# Altium PCB K601-6252双模带屏 VER 1.1 2026 10 16.PcbDoc (part 8 of 12)
Units mm, origin at the board's own origin, x right, y up, seen from the top; angles counter-clockwise.
Board outline 75.02 x 25.73 mm, 2 copper layers (Top Layer, Bottom Layer); 43 components, 67 nets, 219 pads, 157 vias.
Unrouted connection lines stored in the file: 1.
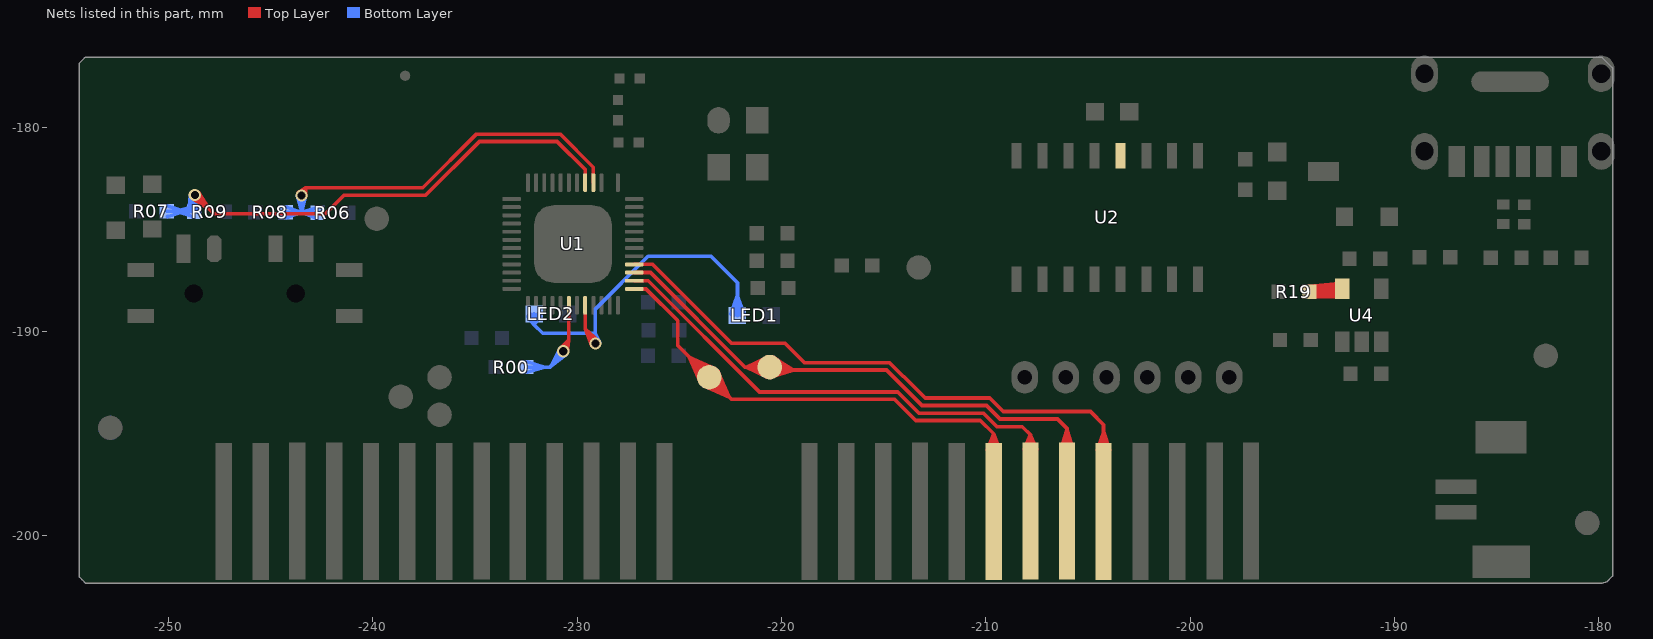
[diagram p8: the nets of this part, all layers, seen from the top]

## Via types
v1: diameter 0.6, hole 0.4, Top Layer to Bottom Layer, tented both sides, 154 vias
v2: diameter 0.6, hole 0.4, Top Layer to Bottom Layer, 3 vias

## Nets (pads, with @x,y where several pads share a name; then routed paths per layer and width w, separated by ;. In a path a pad name is that pad's centre, name@x,y a point inside that pad or via, vN(x,y) a via of type N, cw(c..) or ccw(c..) an arc to the next point about the centre after c; other vN are vias at no path point) (continued)
MODE-BT: R06.2 R08.1 U1.4 | length 53.3
  Top Layer w0.18: U1.4@-229.2,-182.723 -229.2,-181.973 ; v1@-243.63,-183.206 -243.275,-182.973 ; v1@-243.63,-183.206 -243.275,-182.973 ; v1@-243.63,-183.206 -243.275,-182.973 ; v1@-243.63,-183.206 -243.275,-182.973 ; v1@-243.63,-183.206 -243.275,-182.973 ; v1(-243.475,-183.348) -243.475,-183.173 -243.275,-182.973 ; v1(-243.475,-183.348) -243.275,-182.973 ; v1(-243.475,-183.348) -243.275,-182.973 ; v1(-243.475,-183.348) -243.275,-182.973 ; v1(-243.475,-183.348) -243.275,-182.973 ; -243.275,-182.973 -237.546,-182.973 -234.921,-180.348 -230.825,-180.348 -229.2,-181.973 ; -243.275,-182.973 v1@-243.271,-183.398 ; -243.275,-182.973 v1@-243.271,-183.398 ; -243.275,-182.973 v1@-243.271,-183.398 ; -243.275,-182.973 v1@-243.271,-183.398 ; -243.275,-182.973 v1@-243.271,-183.398 ; U1.4@-229.2,-182.368 -229.2,-181.973 ; U1.4@-229.2,-182.368 -229.2,-181.973 ; U1.4@-229.2,-182.368 -229.2,-181.973
  Bottom Layer w0.18: R08.1@-244.25,-184.173 -243.5,-184.173 ; R08.1@-244.25,-184.173 -243.5,-184.173 ; R08.1@-244.25,-184.173 -243.5,-184.173 ; R08.1@-244.205,-184.429 -243.5,-184.173 ; R08.1@-244.205,-184.429 -243.5,-184.173 ; R08.1@-244.205,-184.429 -243.5,-184.173 ; R08.1@-244.205,-184.429 -243.5,-184.173 ; R08.1@-244.205,-183.917 -243.5,-184.173 ; R08.1@-244.205,-183.917 -243.5,-184.173 ; R08.1@-244.205,-183.917 -243.5,-184.173 ; R08.1@-244.205,-183.917 -243.5,-184.173 ; v1@-243.683,-183.375 -243.475,-184.148 ; v1@-243.683,-183.375 -243.475,-184.148 ; v1@-243.683,-183.375 -243.475,-184.148 ; v1@-243.683,-183.375 -243.475,-184.148 ; -243.5,-184.173 -243.475,-184.148 ; -243.5,-184.173 -242.725,-184.173 R06.2@-242.7,-184.198 ; -243.5,-184.173 R06.2@-242.75,-184.453 ; -243.5,-184.173 R06.2@-242.734,-183.94 ; -243.5,-184.173 R06.2@-242.7,-184.198 ; -243.5,-184.173 R06.2@-242.75,-184.453 ; -243.5,-184.173 R06.2@-242.734,-183.94 ; -243.5,-184.173 R06.2@-242.7,-184.198 ; -243.5,-184.173 R06.2@-242.75,-184.453 ; -243.5,-184.173 R06.2@-242.734,-183.94 ; -243.5,-184.173 R06.2@-242.7,-184.198 ; -243.5,-184.173 R06.2@-242.75,-184.453 ; -243.5,-184.173 R06.2@-242.734,-183.94 ; -243.5,-184.173 R06.2@-242.7,-184.198 ; -243.5,-184.173 R06.2@-242.75,-184.453 ; -243.5,-184.173 R06.2@-242.734,-183.94 ; -243.475,-184.148 v1(-243.475,-183.348) ; -243.475,-184.148 v1@-243.267,-183.375 ; -243.475,-184.148 v1@-243.267,-183.375 ; -243.475,-184.148 v1@-243.267,-183.375 ; -243.475,-184.148 v1(-243.475,-183.348) ; -243.475,-184.148 v1@-243.267,-183.375 ; -243.475,-184.148 v1(-243.475,-183.348)
MODE_2.4G: R07.1 R09.2 U1.5 | length 190.4
  Top Layer w0.18: U1.5@-229.6,-182.723 -229.6,-182.082 ; v1@-248.832,-183.486 -248.018,-184.004 ; v1@-248.832,-183.486 -248.018,-184.004 ; v1@-248.832,-183.486 -248.018,-184.004 ; v1@-248.832,-183.486 -248.018,-184.004 ; v1(-248.7,-183.323) -247.775,-184.248 -242.303,-184.248 -241.388,-183.333 -237.397,-183.333 -234.772,-180.708 -230.974,-180.708 -229.6,-182.082 ; v1(-248.7,-183.323) -248.018,-184.004 ; v1(-248.7,-183.323) -248.018,-184.004 ; v1@-248.536,-183.191 -248.018,-184.004 ; v1@-248.536,-183.191 -248.018,-184.004 ; v1@-248.536,-183.191 -248.018,-184.004 ; v1@-248.536,-183.191 -248.018,-184.004 ; U1.5@-229.6,-182.368 -229.6,-182.082 ; U1.5@-229.6,-182.368 -229.6,-182.082 ; U1.5@-229.6,-182.368 -229.6,-182.082
  Bottom Layer w0.18: v1@-248.905,-183.278 R09.2@-248.963,-184.038 ; v1@-248.891,-183.41 R09.2@-248.481,-184.053 ; v1@-248.492,-183.291 R09.2@-248.484,-184.045 ; v1@-248.493,-183.291 R09.2@-248.481,-184.053 ; R07.1@-250.075,-184.123 -248.745,-184.123 R09.2@-248.725,-184.143 ; R07.1@-250.075,-184.123 -249.185,-184.123 ; R07.1@-250.075,-184.123 -249.185,-184.123 ; R07.1@-250.037,-184.38 -249.185,-184.123 ; R07.1@-250.037,-184.38 -249.185,-184.123 ; R07.1@-250.037,-184.38 -249.185,-184.123 ; R07.1@-250.037,-184.38 -249.185,-184.123 ; R07.1@-250.037,-183.865 -249.185,-184.123 ; R07.1@-250.037,-183.865 -249.185,-184.123 ; R07.1@-250.037,-183.865 -249.185,-184.123 ; R07.1@-250.037,-183.865 -249.185,-184.123 ; -249.615,-184.123 R09.2@-248.769,-184.399 ; -249.615,-184.123 R09.2@-248.757,-183.885 ; -249.615,-184.123 R09.2@-248.725,-184.143 ; -249.615,-184.123 R09.2@-248.769,-184.399 ; -249.615,-184.123 R09.2@-248.757,-183.885 ; -249.615,-184.123 R09.2@-248.725,-184.143 ; -249.615,-184.123 R09.2@-248.769,-184.399 ; -249.615,-184.123 R09.2@-248.757,-183.885 ; -249.615,-184.123 R09.2@-248.725,-184.143 ; -249.615,-184.123 R09.2@-248.769,-184.399 ; -249.615,-184.123 R09.2@-248.757,-183.885 ; -249.615,-184.123 R09.2@-248.725,-184.143 ; R09.2@-248.984,-184.16 v1@-248.909,-183.343 ; R09.2@-248.984,-184.16 v1@-248.511,-183.413 ; R09.2@-248.984,-184.16 v1@-248.906,-183.279 ; R09.2@-248.984,-184.16 v1(-248.7,-183.323) ; R09.2@-248.985,-184.158 v1@-248.905,-183.277 ; R09.2@-248.985,-184.158 v1@-248.511,-183.414 ; R09.2@-248.985,-184.158 v1@-248.905,-183.279 ; R09.2@-248.985,-184.158 v1(-248.7,-183.323) ; R09.2@-248.985,-184.156 v1@-248.892,-183.408 ; R09.2@-248.985,-184.156 v1@-248.511,-183.414 ; R09.2@-248.985,-184.156 v1@-248.905,-183.279 ; R09.2@-248.985,-184.156 v1(-248.7,-183.323) ; R09.2@-248.982,-184.1 v1@-248.725,-183.348 ; R09.2@-248.982,-184.1 v1@-248.513,-183.419 ; R09.2@-248.982,-184.1 v1@-248.905,-183.277 ; R09.2@-248.982,-184.1 v1(-248.7,-183.323) ; R09.2@-248.982,-184.1 v1@-248.725,-183.348 ; R09.2@-248.982,-184.1 v1@-248.725,-183.348 ; R09.2@-248.982,-184.1 v1@-248.725,-183.348 ; R09.2@-248.982,-184.1 v1@-248.513,-183.419 ; R09.2@-248.982,-184.1 v1@-248.905,-183.277 ; R09.2@-248.982,-184.1 v1(-248.7,-183.323) ; R09.2@-248.982,-184.1 v1@-248.513,-183.419 ; R09.2@-248.982,-184.1 v1@-248.905,-183.277 ; R09.2@-248.982,-184.1 v1(-248.7,-183.323) ; R09.2@-248.982,-184.1 v1@-248.513,-183.419 ; R09.2@-248.982,-184.1 v1@-248.905,-183.277 ; R09.2@-248.982,-184.1 v1(-248.7,-183.323) ; R09.2@-248.982,-184.1 v1@-248.513,-183.419 ; R09.2@-248.982,-184.1 v1@-248.905,-183.277 ; R09.2@-248.982,-184.1 v1@-248.513,-183.419 ; R09.2@-248.982,-184.1 v1@-248.905,-183.277 ; R09.2@-248.982,-184.1 v1(-248.7,-183.323) ; R09.2@-248.982,-184.1 v1@-248.513,-183.419 ; R09.2@-248.982,-184.1 v1@-248.905,-183.277 ; R09.2@-248.982,-184.1 v1(-248.7,-183.323) ; R09.2@-248.982,-184.1 v1@-248.513,-183.419 ; R09.2@-248.982,-184.1 v1@-248.905,-183.277 ; R09.2@-248.982,-184.1 v1(-248.7,-183.323) ; R09.2@-248.98,-184.094 v1(-248.7,-183.323) ; R09.2@-248.98,-184.094 v1(-248.7,-183.323) ; R09.2@-248.98,-184.094 v1(-248.7,-183.323) ; R09.2@-248.98,-184.094 v1@-248.514,-183.419 ; R09.2@-248.98,-184.094 v1@-248.905,-183.277 ; R09.2@-248.98,-184.094 v1@-248.514,-183.419 ; R09.2@-248.98,-184.094 v1@-248.905,-183.277 ; R09.2@-248.98,-184.094 v1@-248.514,-183.419 ; R09.2@-248.98,-184.094 v1@-248.905,-183.277 ; R09.2@-248.963,-184.038 v1@-248.493,-183.289 ; R09.2@-248.963,-184.038 v1@-248.515,-183.422 ; R09.2@-248.963,-184.038 v1(-248.7,-183.323) ; R09.2@-248.96,-184.03 v1@-248.493,-183.356 ; R09.2@-248.96,-184.03 v1@-248.515,-183.422 ; R09.2@-248.96,-184.03 v1@-248.905,-183.278 ; R09.2@-248.96,-184.03 v1(-248.7,-183.323) ; R09.2@-248.958,-184.028 v1@-248.513,-183.419 ; R09.2@-248.958,-184.028 v1@-248.515,-183.422 ; R09.2@-248.958,-184.028 v1@-248.905,-183.279 ; R09.2@-248.958,-184.028 v1(-248.7,-183.323) ; v1@-248.909,-183.343 R09.2@-248.725,-184.143 ; v1@-248.909,-183.343 R09.2@-248.484,-184.045 ; v1@-248.909,-183.343 R09.2@-248.725,-184.143 ; v1@-248.909,-183.343 R09.2@-248.725,-184.143 ; v1@-248.909,-183.343 R09.2@-248.725,-184.143 ; v1@-248.909,-183.343 R09.2@-248.725,-184.143 ; v1@-248.909,-183.343 R09.2@-248.725,-184.143 ; v1@-248.909,-183.343 R09.2@-248.725,-184.143 ; v1@-248.909,-183.343 R09.2@-248.725,-184.143 ; v1@-248.909,-183.343 R09.2@-248.725,-184.143 ; v1@-248.909,-183.343 R09.2@-248.725,-184.143 ; v1@-248.909,-183.343 R09.2@-248.725,-184.143 ; v1@-248.909,-183.343 R09.2@-248.725,-184.143 ; v1@-248.909,-183.343 R09.2@-248.725,-184.143 ; v1@-248.905,-183.277 R09.2@-248.481,-184.053 ; v1@-248.905,-183.277 R09.2@-248.725,-184.143 ; v1@-248.894,-183.402 R09.2@-248.467,-184.172 ; v1@-248.895,-183.402 R09.2@-248.467,-184.176 ; v1@-248.895,-183.402 R09.2@-248.467,-184.173 ; v1@-248.892,-183.408 R09.2@-248.469,-184.1 ; v1@-248.892,-183.408 R09.2@-248.485,-184.042 ; v1@-248.892,-183.408 R09.2@-248.725,-184.143 ; v1@-248.892,-183.408 R09.2@-248.469,-184.1 ; v1@-248.892,-183.408 R09.2@-248.469,-184.1 ; v1@-248.892,-183.408 R09.2@-248.469,-184.1 ; v1@-248.892,-183.408 R09.2@-248.469,-184.1 ; v1@-248.892,-183.408 R09.2@-248.469,-184.1 ; v1@-248.892,-183.408 R09.2@-248.469,-184.1 ; v1@-248.892,-183.408 R09.2@-248.469,-184.1 ; v1@-248.892,-183.407 R09.2@-248.467,-184.109 ; v1@-248.892,-183.407 R09.2@-248.467,-184.109 ; v1@-248.892,-183.407 R09.2@-248.467,-184.109 ; R09.2@-248.769,-184.399 -249.615,-184.123 R09.2@-248.757,-183.885 ; R09.2@-248.725,-184.143 v1@-248.725,-183.348 ; R09.2@-248.725,-184.143 v1@-248.493,-183.356 ; R09.2@-248.725,-184.143 v1(-248.7,-183.323) ; R09.2@-248.725,-184.143 v1@-248.725,-183.348 ; R09.2@-248.725,-184.143 v1@-248.493,-183.289 ; R09.2@-248.725,-184.143 v1(-248.7,-183.323) ; R09.2@-248.725,-184.143 v1@-248.513,-183.419 ; R09.2@-248.725,-184.143 v1@-248.725,-183.348 ; R09.2@-248.725,-184.143 v1(-248.7,-183.323) ; R09.2@-248.725,-184.143 v1@-248.493,-183.356 ; R09.2@-248.725,-184.143 v1(-248.7,-183.323) ; R09.2@-248.725,-184.143 v1@-248.493,-183.356 ; R09.2@-248.725,-184.143 v1(-248.7,-183.323) ; R09.2@-248.725,-184.143 v1@-248.493,-183.356 ; R09.2@-248.725,-184.143 v1(-248.7,-183.323) ; R09.2@-248.725,-184.143 v1@-248.493,-183.356 ; R09.2@-248.725,-184.143 v1@-248.493,-183.356 ; R09.2@-248.725,-184.143 v1(-248.7,-183.323) ; R09.2@-248.725,-184.143 v1@-248.493,-183.356 ; R09.2@-248.725,-184.143 v1(-248.7,-183.323) ; R09.2@-248.725,-184.143 v1@-248.493,-183.356 ; R09.2@-248.725,-184.143 v1@-248.493,-183.356 ; R09.2@-248.725,-184.143 v1(-248.7,-183.323) ; R09.2@-248.725,-184.143 v1@-248.493,-183.356 ; R09.2@-248.725,-184.143 v1@-248.493,-183.356 ; R09.2@-248.725,-184.143 v1(-248.7,-183.323) ; R09.2@-248.725,-184.143 v1@-248.493,-183.356 ; R09.2@-248.725,-184.143 v1(-248.7,-183.323) ; R09.2@-248.725,-184.143 v1@-248.493,-183.356 ; R09.2@-248.725,-184.143 v1(-248.7,-183.323) ; v1@-248.725,-183.348 v1(-248.7,-183.323) ; v1@-248.725,-183.348 R09.2@-248.469,-184.1 ; v1@-248.725,-183.348 R09.2@-248.469,-184.1 ; v1@-248.725,-183.348 R09.2@-248.469,-184.1 ; v1@-248.725,-183.348 R09.2@-248.469,-184.1 ; v1(-248.7,-183.323) R09.2@-248.469,-184.1 ; v1(-248.7,-183.323) R09.2@-248.467,-184.109 ; v1(-248.7,-183.323) R09.2@-248.467,-184.109 ; v1(-248.7,-183.323) R09.2@-248.467,-184.109 ; v1(-248.7,-183.323) R09.2@-248.467,-184.172 ; v1(-248.7,-183.323) R09.2@-248.469,-184.1 ; v1(-248.7,-183.323) R09.2@-248.469,-184.1 ; v1(-248.7,-183.323) R09.2@-248.469,-184.1 ; v1(-248.7,-183.323) R09.2@-248.469,-184.1 ; v1(-248.7,-183.323) R09.2@-248.467,-184.176 ; v1(-248.7,-183.323) R09.2@-248.467,-184.173 ; v1(-248.7,-183.323) R09.2@-248.469,-184.1 ; v1(-248.7,-183.323) R09.2@-248.469,-184.1 ; v1(-248.7,-183.323) R09.2@-248.484,-184.045 ; v1(-248.7,-183.323) R09.2@-248.485,-184.042 ; v1(-248.7,-183.323) R09.2@-248.481,-184.053 ; v1@-248.513,-183.419 R09.2@-248.467,-184.172 ; v1@-248.493,-183.356 R09.2@-248.467,-184.176 ; v1@-248.493,-183.289 R09.2@-248.469,-184.1 ; v1@-248.493,-183.289 R09.2@-248.467,-184.173 ; v1@-248.493,-183.289 R09.2@-248.469,-184.1 ; v1@-248.493,-183.289 R09.2@-248.469,-184.1 ; v1@-248.493,-183.289 R09.2@-248.469,-184.1 ; v1@-248.493,-183.289 R09.2@-248.469,-184.1 ; v1@-248.493,-183.289 R09.2@-248.469,-184.1 ; v1@-248.493,-183.289 R09.2@-248.467,-184.109 ; v1@-248.493,-183.289 R09.2@-248.467,-184.109 ; v1@-248.493,-183.289 R09.2@-248.469,-184.1 ; v1@-248.493,-183.289 R09.2@-248.467,-184.109 ; v1@-248.493,-183.289 R09.2@-248.469,-184.1 ; v1@-248.492,-183.291 R09.2@-248.467,-184.172 ; v1@-248.492,-183.292 R09.2@-248.467,-184.176 ; v1@-248.492,-183.292 R09.2@-248.467,-184.173 ; v1@-248.492,-183.291 R09.2@-248.485,-184.042 ; R09.2@-248.485,-184.042 -248.891,-183.41 R09.2@-248.484,-184.045
MODE_BLE: 
P00: 
P32: R00.1 U1.30 | length 38
  Top Layer w0.18: U1.30@-230.4,-188.723 -230.4,-190.423 ; v1@-230.844,-190.848 -230.4,-190.423 ; v1@-230.844,-190.848 -230.4,-190.423 ; v1@-230.844,-190.848 -230.4,-190.423 ; v1@-230.844,-190.848 -230.4,-190.423 ; v1@-230.844,-190.848 -230.4,-190.423 ; v1(-230.675,-190.973) -230.675,-190.698 -230.4,-190.423 ; v1(-230.675,-190.973) -230.4,-190.423 ; v1(-230.675,-190.973) -230.4,-190.423 ; v1(-230.675,-190.973) -230.4,-190.423 ; v1(-230.675,-190.973) -230.4,-190.423 ; v1@-230.474,-191.033 -230.4,-190.423 ; v1@-230.474,-191.033 -230.4,-190.423 ; v1@-230.474,-191.033 -230.4,-190.423 ; v1@-230.474,-191.033 -230.4,-190.423 ; v1@-230.474,-191.033 -230.4,-190.423 ; -230.4,-189.713 U1.30@-230.4,-189.078 ; -230.4,-189.713 U1.30@-230.4,-189.078 ; -230.4,-189.713 U1.30@-230.4,-189.078
  Bottom Layer w0.18: v1@-230.851,-190.858 -231.267,-191.689 ; R00.1@-232.475,-191.748 -231.325,-191.748 -230.675,-191.098 v1(-230.675,-190.973) ; R00.1@-232.475,-191.748 -231.585,-191.748 ; R00.1@-232.475,-191.748 -231.585,-191.748 ; R00.1@-232.437,-192.005 -231.585,-191.748 ; R00.1@-232.437,-192.005 -231.585,-191.748 ; R00.1@-232.437,-192.005 -231.585,-191.748 ; R00.1@-232.437,-192.005 -231.585,-191.748 ; R00.1@-232.437,-191.49 -231.585,-191.748 ; R00.1@-232.437,-191.49 -231.585,-191.748 ; R00.1@-232.437,-191.49 -231.585,-191.748 ; R00.1@-232.437,-191.49 -231.585,-191.748 ; -231.274,-191.696 v1@-230.529,-191.124 ; -231.274,-191.696 v1@-230.851,-190.858 ; -231.274,-191.696 v1(-230.675,-190.973) ; -231.274,-191.696 v1@-230.529,-191.124 ; -231.274,-191.696 v1@-230.851,-190.858 ; -231.274,-191.696 v1(-230.675,-190.973) ; -231.274,-191.696 v1@-230.529,-191.124 ; -231.274,-191.696 v1@-230.851,-190.858 ; -231.274,-191.696 v1(-230.675,-190.973) ; -231.274,-191.696 v1@-230.529,-191.124 ; -231.274,-191.696 v1@-230.851,-190.858 ; -231.274,-191.696 v1(-230.675,-190.973) ; -231.267,-191.689 v1@-230.529,-191.124 ; -231.267,-191.689 v1(-230.675,-190.973)
PROG: R19.2 U4.5 | length 330.9
  Top Layer w0.305: R19.2@-194.208,-187.868 U4.5@-192.839,-187.74 ; R19.2@-194.187,-188.26 U4.5@-192.887,-188.237 ; R19.2@-194.186,-188.26 -192.915,-188.231 ; R19.2@-194.185,-187.865 U4.5@-192.796,-187.897 ; R19.2@-194.184,-187.865 U4.5@-192.734,-187.901 ; R19.2@-194.181,-187.865 U4.5@-192.85,-187.926 ; R19.2@-194.166,-188.26 U4.5@-192.695,-188.096 ; R19.2@-194.161,-188.26 U4.5@-192.776,-188.065 ; R19.2@-194.138,-188.257 U4.5@-192.796,-187.897 ; R19.2@-194.115,-188.251 U4.5@-192.839,-187.74 ; U4.5@-192.59,-187.864 -193.799,-188.211 ; U4.5@-192.588,-187.864 -193.796,-188.202 ; U4.5@-192.584,-187.713 -193.81,-188.03 ; U4.5@-192.584,-187.863 -193.798,-188.172 ; U4.5@-192.582,-187.863 R19.2@-193.924,-188.18 ; U4.5@-192.581,-187.712 R19.2@-194.175,-188.063 ; U4.5@-192.579,-187.712 R19.2@-193.927,-188.011 ; U4.5@-192.573,-188.104 R19.2@-193.905,-187.851 ; U4.5@-192.558,-187.71 R19.2@-194.101,-187.87 ; U4.5@-192.556,-187.71 R19.2@-193.905,-187.851 ; U4.5@-192.549,-188.105 R19.2@-193.927,-188.011 ; U4.5@-192.546,-188.105 -193.81,-188.03 ; U4.5@-192.543,-188.255 -193.796,-188.202 ; U4.5@-192.543,-188.105 R19.2@-194.175,-188.063 ; U4.5@-192.541,-188.255 -193.799,-188.211 ; R19.2@-194.208,-187.868 U4.5@-192.895,-187.743 ; R19.2@-194.208,-187.868 U4.5@-192.895,-187.743 ; R19.2@-194.208,-187.868 U4.5@-192.894,-187.745 ; R19.2@-194.201,-188.259 -193.799,-188.211 ; R19.2@-194.201,-188.259 -193.799,-188.211 ; R19.2@-194.201,-188.259 -193.799,-188.211 ; R19.2@-194.2,-187.867 U4.5@-192.89,-187.797 ; R19.2@-194.2,-187.867 -192.924,-187.801 ; R19.2@-194.2,-187.867 U4.5@-192.89,-187.797 ; R19.2@-194.2,-187.867 U4.5@-192.893,-187.797 ; R19.2@-194.2,-187.867 U4.5@-192.892,-187.798 ; R19.2@-194.2,-187.867 U4.5@-192.89,-187.797 ; R19.2@-194.2,-187.867 U4.5@-192.888,-187.797 ; R19.2@-194.2,-187.867 U4.5@-192.889,-187.797 ; R19.2@-194.196,-188.259 -193.796,-188.202 ; R19.2@-194.196,-188.259 -193.796,-188.202 ; R19.2@-194.196,-188.259 -193.796,-188.202 ; R19.2@-194.185,-187.865 U4.5@-192.674,-187.888 ; R19.2@-194.185,-187.865 U4.5@-192.659,-187.884 ; R19.2@-194.185,-187.865 U4.5@-192.873,-187.899 ; R19.2@-194.185,-187.865 U4.5@-192.873,-187.899 ; R19.2@-194.185,-187.865 U4.5@-192.868,-187.9 ; R19.2@-194.181,-188.26 -193.798,-188.172 ; R19.2@-194.181,-188.26 -193.798,-188.172 ; R19.2@-194.181,-188.26 -193.798,-188.172 ; R19.2@-194.177,-187.865 -192.9,-187.949 ; R19.2@-194.178,-187.865 -192.915,-187.943 ; R19.2@-194.177,-187.865 -192.9,-187.949 ; R19.2@-194.177,-187.865 -192.9,-187.949 ; R19.2@-194.177,-187.865 -192.9,-187.949 ; R19.2@-194.177,-187.865 -192.914,-187.951 R19.2@-194.142,-188.257 ; R19.2@-194.177,-187.865 -192.9,-187.949 ; R19.2@-194.177,-187.865 U4.5@-192.899,-187.949 ; R19.2@-194.177,-187.865 U4.5@-192.9,-187.949 ; R19.2@-194.175,-188.063 -192.705,-188.063 U4.5@-192.55,-187.908 ; R19.2@-194.175,-188.063 -192.91,-188.093 ; R19.2@-194.175,-188.063 U4.5@-192.89,-187.797 ; R19.2@-194.175,-188.063 -192.9,-187.949 ; R19.2@-194.175,-188.063 U4.5@-192.55,-187.908 ; R19.2@-194.175,-188.063 -192.91,-188.091 ; R19.2@-194.175,-188.063 -193.808,-188.058 ; R19.2@-194.175,-188.063 -192.912,-187.805 ; R19.2@-194.175,-188.063 -193.808,-188.058 ; R19.2@-194.175,-188.063 -192.913,-188.239 ; R19.2@-194.175,-188.063 -193.796,-188.202 ; R19.2@-194.175,-188.063 U4.5@-192.674,-187.888 ; R19.2@-194.175,-188.063 -193.796,-188.202 ; R19.2@-194.175,-188.063 U4.5@-192.55,-188.058 ; R19.2@-194.175,-188.063 -193.796,-188.202 ; R19.2@-194.175,-188.063 -192.912,-188.242 ; R19.2@-194.175,-188.063 -193.799,-188.211 ; R19.2@-194.175,-188.063 U4.5@-192.659,-187.884 ; R19.2@-194.175,-188.063 -193.799,-188.211 ; R19.2@-194.175,-188.063 U4.5@-192.55,-188.058 ; R19.2@-194.175,-188.063 -193.799,-188.211 ; R19.2@-194.175,-188.063 -192.915,-188.231 ; R19.2@-194.175,-188.063 -193.798,-188.172 ; R19.2@-194.175,-188.063 U4.5@-192.734,-187.901 ; R19.2@-194.175,-188.063 -193.798,-188.172 ; R19.2@-194.175,-188.063 U4.5@-192.55,-188.058 ; R19.2@-194.175,-188.063 -193.798,-188.172 ; R19.2@-194.175,-188.063 U4.5@-192.695,-188.096 ; R19.2@-194.175,-188.063 -193.81,-188.03 ; R19.2@-194.175,-188.063 -192.924,-187.801 ; R19.2@-194.175,-188.063 -193.81,-188.03 ; R19.2@-194.175,-188.063 -192.915,-187.943 ; R19.2@-194.175,-188.063 -193.81,-188.03 ; R19.2@-194.175,-188.063 -192.91,-188.093 ; R19.2@-194.175,-188.063 U4.5@-192.89,-187.797 ; R19.2@-194.175,-188.063 -192.9,-187.949 ; R19.2@-194.175,-188.063 -192.911,-188.063 ; R19.2@-194.175,-188.063 -192.911,-188.063 ; R19.2@-194.175,-188.063 -192.91,-188.093 ; R19.2@-194.175,-188.063 -192.91,-188.093 ; R19.2@-194.175,-188.063 U4.5@-192.893,-187.797 ; R19.2@-194.175,-188.063 U4.5@-192.892,-187.798 ; R19.2@-194.175,-188.063 -192.9,-187.949 ; R19.2@-194.175,-188.063 -192.9,-187.949 ; R19.2@-194.175,-188.063 -192.91,-188.093 ; R19.2@-194.175,-188.063 U4.5@-192.89,-187.797 ; R19.2@-194.175,-188.063 -192.9,-187.949 ; R19.2@-194.175,-188.063 -192.909,-188.093 ; R19.2@-194.175,-188.063 U4.5@-192.888,-187.797 ; R19.2@-194.175,-188.063 U4.5@-192.899,-187.949 ; R19.2@-194.175,-188.063 -192.909,-188.093 ; R19.2@-194.175,-188.063 U4.5@-192.889,-187.797 ; R19.2@-194.175,-188.063 U4.5@-192.9,-187.949 ; R19.2@-194.175,-188.063 U4.5@-192.867,-188.06 ; R19.2@-194.175,-188.063 U4.5@-192.895,-187.743 ; R19.2@-194.175,-188.063 U4.5@-192.873,-187.899 ; R19.2@-194.175,-188.063 U4.5@-192.866,-188.06 ; R19.2@-194.175,-188.063 U4.5@-192.895,-187.743 ; R19.2@-194.175,-188.063 U4.5@-192.873,-187.899 ; R19.2@-194.175,-188.063 U4.5@-192.776,-188.065 ; R19.2@-194.175,-188.063 U4.5@-192.839,-187.74 ; R19.2@-194.175,-188.063 U4.5@-192.796,-187.897 ; R19.2@-194.175,-188.063 U4.5@-192.887,-188.237 ; R19.2@-194.175,-188.063 U4.5@-192.85,-187.926 ; R19.2@-194.175,-188.063 U4.5@-192.86,-188.085 ; R19.2@-194.175,-188.063 U4.5@-192.896,-188.082 ; R19.2@-194.175,-188.063 -192.932,-187.79 ; R19.2@-194.175,-188.063 -192.912,-187.935 ; R19.2@-194.175,-188.063 U4.5@-192.859,-188.06 ; R19.2@-194.175,-188.063 U4.5@-192.894,-187.745 ; R19.2@-194.175,-188.063 U4.5@-192.868,-187.9 ; R19.2@-194.164,-188.26 -192.91,-188.093 ; R19.2@-194.164,-188.26 -192.91,-188.093 ; R19.2@-194.164,-188.26 -192.91,-188.093 ; R19.2@-194.164,-188.26 -192.91,-188.093 ; R19.2@-194.164,-188.26 -192.911,-188.093 R19.2@-194.155,-187.866 ; R19.2@-194.164,-188.26 -192.91,-188.093 ; R19.2@-194.164,-188.26 -192.909,-188.093 ; R19.2@-194.165,-188.26 -192.911,-188.096 R19.2@-194.155,-187.866 ; R19.2@-194.164,-188.26 -192.91,-188.091 ; R19.2@-194.164,-188.26 -192.909,-188.093 ; R19.2@-194.164,-188.26 U4.5@-192.86,-188.085 ; R19.2@-194.164,-187.865 U4.5@-192.55,-188.058 ; R19.2@-194.164,-187.865 U4.5@-192.55,-188.058 ; R19.2@-194.164,-187.865 U4.5@-192.55,-188.058 ; R19.2@-194.162,-188.26 U4.5@-192.55,-188.058 ; R19.2@-194.162,-188.26 U4.5@-192.55,-188.058 ; R19.2@-194.162,-188.26 U4.5@-192.55,-188.058 ; R19.2@-194.163,-188.26 U4.5@-192.896,-188.082 ; R19.2@-194.161,-187.866 U4.5@-192.867,-188.06 ; R19.2@-194.161,-187.866 U4.5@-192.866,-188.06 ; R19.2@-194.161,-187.866 U4.5@-192.776,-188.065 ; R19.2@-194.161,-187.866 U4.5@-192.859,-188.06 ; R19.2@-194.16,-188.26 -192.911,-188.063 ; R19.2@-194.16,-188.26 -192.911,-188.063 ; R19.2@-194.16,-188.26 -192.911,-188.063 ; R19.2@-194.16,-188.26 -192.911,-188.063 ; R19.2@-194.16,-188.26 U4.5@-192.867,-188.06 ; R19.2@-194.16,-188.26 U4.5@-192.866,-188.06 ; R19.2@-194.16,-188.26 U4.5@-192.859,-188.06 ; R19.2@-194.16,-187.866 -192.911,-188.063 ; R19.2@-194.16,-187.866 U4.5@-192.567,-188.104 ; R19.2@-194.16,-187.866 -192.557,-187.71 R19.2@-194.155,-187.866 ; R19.2@-194.16,-187.866 U4.5@-192.55,-187.908 ; R19.2@-194.16,-187.866 -192.911,-188.063 ; R19.2@-194.16,-187.866 -192.911,-188.063 ; R19.2@-194.16,-187.866 -192.911,-188.063 ; R19.2@-194.157,-187.866 U4.5@-192.695,-188.096 ; R19.2@-194.157,-187.866 U4.5@-192.86,-188.085 ; R19.2@-194.157,-187.866 U4.5@-192.896,-188.082 ; R19.2@-194.155,-187.866 -192.91,-188.093 ; R19.2@-194.155,-187.866 U4.5@-192.567,-188.104 ; R19.2@-194.155,-187.866 U4.5@-192.55,-187.908 ; R19.2@-194.155,-187.866 -192.91,-188.091 ; R19.2@-194.155,-187.866 -192.91,-188.093 ; R19.2@-194.155,-187.866 -192.91,-188.093 ; R19.2@-194.155,-187.866 -192.91,-188.093 ; R19.2@-194.155,-187.866 -192.91,-188.093 ; R19.2@-194.155,-187.866 -192.909,-188.093 ; R19.2@-194.155,-187.866 -192.909,-188.093 ; R19.2@-194.142,-188.258 -192.9,-187.949 ; R19.2@-194.142,-188.258 -192.9,-187.949 ; R19.2@-194.142,-188.258 -192.9,-187.949 ; R19.2@-194.142,-188.258 -192.9,-187.949 ; R19.2@-194.142,-188.258 -192.9,-187.949 ; R19.2@-194.142,-188.258 U4.5@-192.899,-187.949 ; R19.2@-194.142,-188.258 U4.5@-192.9,-187.949 ; R19.2@-194.141,-188.257 -192.915,-187.943 ; R19.2@-194.141,-188.257 -192.915,-187.942 -194.178,-187.865 -192.912,-187.935 ; R19.2@-194.14,-188.257 U4.5@-192.85,-187.926 ; R19.2@-194.139,-188.257 U4.5@-192.674,-187.888 ; R19.2@-194.139,-188.257 U4.5@-192.659,-187.884 ; R19.2@-194.14,-188.257 U4.5@-192.734,-187.901 ; R19.2@-194.14,-188.257 -192.912,-187.935 ; R19.2@-194.139,-187.868 -193.81,-188.03 ; R19.2@-194.139,-187.868 -193.81,-188.03 ; R19.2@-194.139,-187.868 -193.81,-188.03 ; R19.2@-194.136,-188.256 U4.5@-192.873,-187.899 ; R19.2@-194.136,-188.256 U4.5@-192.873,-187.899 ; R19.2@-194.136,-188.256 U4.5@-192.868,-187.9 ; R19.2@-194.121,-188.253 U4.5@-192.89,-187.797 ; R19.2@-194.121,-188.253 -192.912,-187.805 ; R19.2@-194.121,-188.253 U4.5@-192.89,-187.797 ; R19.2@-194.121,-188.253 U4.5@-192.892,-187.798 ; R19.2@-194.121,-188.253 U4.5@-192.89,-187.797 ; R19.2@-194.121,-188.253 U4.5@-192.888,-187.797 ; R19.2@-194.121,-188.253 U4.5@-192.889,-187.797 ; R19.2@-194.119,-188.252 -193.808,-188.058 ; R19.2@-194.119,-188.252 -193.808,-188.058 ; R19.2@-194.12,-188.252 -192.924,-187.801 ; R19.2@-194.113,-188.25 U4.5@-192.895,-187.743 ; R19.2@-194.113,-188.25 U4.5@-192.895,-187.743 ; R19.2@-194.113,-188.25 U4.5@-192.894,-187.745 ; R19.2@-194.105,-188.247 -193.81,-188.03 ; R19.2@-194.105,-188.247 -193.81,-188.03 ; R19.2@-194.105,-188.247 -193.81,-188.03 ; R19.2@-194.101,-187.87 U4.5@-192.567,-188.104 ; R19.2@-194.101,-187.87 U4.5@-192.55,-187.908 ; R19.2@-194.074,-187.893 -193.798,-188.172 ; R19.2@-194.074,-187.893 -193.798,-188.172 ; R19.2@-194.074,-187.893 -193.798,-188.172 ; R19.2@-194.064,-187.9 -193.796,-188.202 ; R19.2@-194.064,-187.9 -193.796,-188.202 ; R19.2@-194.064,-187.9 -193.796,-188.202 ; R19.2@-194.06,-187.902 -193.799,-188.211 ; R19.2@-194.06,-187.902 -193.799,-188.211 ; R19.2@-194.06,-187.902 -193.799,-188.211 ; R19.2@-193.927,-188.011 U4.5@-192.55,-187.908 ; R19.2@-193.924,-188.18 -192.547,-188.255 -193.798,-188.172 ; R19.2@-193.924,-188.18 U4.5@-192.55,-188.058 ; R19.2@-193.905,-187.851 U4.5@-192.55,-187.908 ; R19.2@-193.849,-188.063 U4.5@-192.542,-188.105 ; R19.2@-193.849,-188.063 U4.5@-192.588,-187.714 ; R19.2@-193.849,-188.063 U4.5@-192.55,-187.908 ; R19.2@-193.849,-188.063 U4.5@-192.542,-188.105 ; R19.2@-193.849,-188.063 U4.5@-192.588,-187.714 ; R19.2@-193.849,-188.063 U4.5@-192.55,-187.908 ; R19.2@-193.846,-188.063 U4.5@-192.541,-188.105 ; R19.2@-193.846,-188.063 -192.588,-187.714 -193.808,-188.058 ; R19.2@-193.846,-188.063 U4.5@-192.55,-187.908 ; R19.2@-193.846,-188.062 U4.5@-192.542,-188.105 ; R19.2@-193.846,-188.062 U4.5@-192.588,-187.714 ; R19.2@-193.846,-188.062 U4.5@-192.55,-187.908 ; -193.81,-188.03 U4.5@-192.55,-187.908 ; -193.808,-188.058 U4.5@-192.542,-188.105 ; -193.808,-188.058 -194.124,-187.872 -193.808,-188.058 ; -193.799,-188.211 U4.5@-192.55,-188.058 ; -193.798,-188.172 U4.5@-192.55,-188.058 ; -193.796,-188.202 U4.5@-192.55,-188.058 ; -192.932,-187.79 -194.202,-187.867 -192.932,-187.79 -194.118,-188.252 -192.932,-187.79 ; -192.915,-188.231 -194.134,-187.869 U4.5@-192.887,-188.237 ; -192.912,-188.242 -194.132,-187.87 -192.913,-188.239 ; -192.912,-188.242 -194.188,-188.26 -192.913,-188.239 ; -192.912,-187.805 -194.2,-187.867 -192.93,-187.805 -194.12,-188.252 U4.5@-192.893,-187.797 ; -192.911,-188.063 -192.602,-188.248 -192.911,-188.063 ; -192.911,-188.063 -192.607,-187.868 -192.911,-188.063 ; -192.911,-188.063 U4.5@-192.55,-188.058 ; -192.911,-188.063 U4.5@-192.55,-188.058 ; -192.91,-188.093 U4.5@-192.585,-188.252 ; -192.91,-188.093 U4.5@-192.623,-187.874 ; -192.91,-188.093 U4.5@-192.55,-188.058 ; -192.91,-188.093 U4.5@-192.585,-188.252 ; -192.91,-188.093 U4.5@-192.623,-187.874 ; -192.91,-188.093 U4.5@-192.55,-188.058 ; -192.91,-188.093 U4.5@-192.585,-188.252 ; -192.91,-188.093 U4.5@-192.623,-187.874 ; -192.91,-188.093 U4.5@-192.55,-188.058 ; -192.9,-187.949 U4.5@-192.583,-188.103 ; -192.9,-187.949 U4.5@-192.627,-187.726 ; -192.9,-187.949 U4.5@-192.55,-187.908 ; -192.9,-187.949 U4.5@-192.583,-188.103 ; -192.9,-187.949 U4.5@-192.627,-187.726 ; -192.9,-187.949 U4.5@-192.55,-187.908 ; -192.9,-187.949 U4.5@-192.583,-188.103 ; -192.9,-187.949 U4.5@-192.627,-187.726 ; -192.9,-187.949 U4.5@-192.55,-187.908
PWM: LED1.2 LED2.2 U1.32 | length 79.3
  Top Layer w0.18: U1.32@-229.6,-188.723 -229.6,-189.873 ; -229.6,-189.873 -229.1,-190.373 v1(-229.1,-190.598) ; -229.6,-189.873 v1@-229.286,-190.695 ; -229.6,-189.873 v1@-228.943,-190.459 ; -229.6,-189.873 v1(-229.1,-190.598) ; -229.6,-189.873 v1@-229.286,-190.695 ; -229.6,-189.873 v1@-228.943,-190.459 ; -229.6,-189.873 v1(-229.1,-190.598) ; -229.6,-189.873 v1@-229.286,-190.695 ; -229.6,-189.873 v1@-228.943,-190.459 ; -229.6,-189.873 v1(-229.1,-190.598) ; -229.6,-189.873 v1@-229.286,-190.695 ; -229.6,-189.873 v1@-228.943,-190.459 ; -229.6,-189.873 v1(-229.1,-190.598) ; -229.6,-189.873 v1@-229.286,-190.695 ; -229.6,-189.873 v1@-228.943,-190.459 ; -229.6,-189.873 v1(-229.1,-190.598) ; -229.6,-189.713 U1.32@-229.6,-189.078 ; -229.6,-189.713 U1.32@-229.6,-189.078 ; -229.6,-189.713 U1.32@-229.6,-189.078
  Bottom Layer w0.18: LED2.2@-232.418,-189.254 -232.1,-189.677 ; LED2.2@-232.418,-189.254 -232.1,-189.677 ; LED2.2@-232.418,-189.254 -232.1,-189.677 ; LED2.2@-232.418,-189.254 -232.1,-189.677 ; LED2.2@-232.418,-189.254 -232.1,-189.677 ; LED2.2@-232.418,-189.254 -232.1,-189.677 ; LED2.2@-232.253,-189.17 -232.1,-189.677 ; LED2.2@-232.253,-189.17 -232.1,-189.677 ; LED2.2@-232.253,-189.17 -232.1,-189.677 ; LED2.2@-232.253,-189.17 -232.1,-189.677 ; LED2.2@-232.253,-189.17 -232.1,-189.677 ; LED2.2@-232.253,-189.17 -232.1,-189.677 ; -232.1,-189.677 -231.679,-190.098 -229.125,-190.098 -229.1,-190.123 ; -232.1,-189.677 LED2.2@-232.1,-189.148 ; -232.1,-189.677 LED2.2@-231.782,-189.254 ; -232.1,-189.677 LED2.2@-231.947,-189.17 ; -232.1,-189.677 LED2.2@-231.782,-189.254 ; -232.1,-189.677 LED2.2@-231.947,-189.17 ; -232.1,-189.677 LED2.2@-231.782,-189.254 ; -232.1,-189.677 LED2.2@-231.947,-189.17 ; -232.1,-189.677 LED2.2@-232.1,-189.148 ; -232.1,-189.677 LED2.2@-231.782,-189.254 ; -232.1,-189.677 LED2.2@-231.947,-189.17 ; -232.1,-189.677 LED2.2@-232.1,-189.148 ; -232.1,-189.677 LED2.2@-231.782,-189.254 ; -232.1,-189.677 LED2.2@-231.947,-189.17 ; -232.1,-189.677 LED2.2@-232.1,-189.148 ; -232.1,-189.677 LED2.2@-231.782,-189.254 ; -232.1,-189.677 LED2.2@-231.947,-189.17 ; -232.1,-189.677 LED2.2@-232.1,-189.148 ; v1@-229.305,-190.551 -229.1,-190.123 ; v1@-229.305,-190.551 -229.1,-190.123 ; v1@-229.305,-190.551 -229.1,-190.123 ; v1@-229.305,-190.551 -229.1,-190.123 ; v1(-229.1,-190.598) -229.1,-190.123 ; v1(-229.1,-190.598) -229.1,-190.123 ; v1(-229.1,-190.598) -229.1,-190.123 ; -229.1,-190.123 -229.1,-188.907 -226.521,-186.328 -223.445,-186.328 -222.15,-187.623 LED1.2@-222.15,-189.223 ; -229.1,-190.123 v1@-228.895,-190.551 ; -229.1,-190.123 v1@-228.895,-190.551 ; -229.1,-190.123 v1@-228.895,-190.551 ; -229.1,-190.123 v1@-228.895,-190.551 ; LED1.2@-222.48,-189.164 -222.15,-188.258 ; LED1.2@-222.48,-189.164 -222.15,-188.258 ; LED1.2@-222.48,-189.164 -222.15,-188.258 ; LED1.2@-222.48,-189.164 -222.15,-188.258 ; LED1.2@-222.48,-189.164 -222.15,-188.258 ; LED1.2@-222.48,-189.164 -222.15,-188.258 ; LED1.2@-222.305,-189.21 -222.15,-188.258 ; LED1.2@-222.305,-189.21 -222.15,-188.258 ; LED1.2@-222.305,-189.21 -222.15,-188.258 ; LED1.2@-222.305,-189.21 -222.15,-188.258 ; LED1.2@-222.305,-189.21 -222.15,-188.258 ; LED1.2@-222.305,-189.21 -222.15,-188.258 ; LED1.2@-222.15,-189.223 -222.15,-188.258 ; LED1.2@-222.15,-189.223 -222.15,-188.258 ; LED1.2@-222.15,-189.223 -222.15,-188.258 ; LED1.2@-222.15,-189.223 -222.15,-188.258 ; -222.15,-188.258 LED1.2@-221.82,-189.164 ; -222.15,-188.258 LED1.2@-221.996,-189.21 ; -222.15,-188.258 LED1.2@-221.82,-189.164 ; -222.15,-188.258 LED1.2@-221.996,-189.21 ; -222.15,-188.258 LED1.2@-221.82,-189.164 ; -222.15,-188.258 LED1.2@-221.996,-189.21 ; -222.15,-188.258 LED1.2@-221.82,-189.164 ; -222.15,-188.258 LED1.2@-221.996,-189.21 ; -222.15,-188.258 LED1.2@-221.82,-189.164 ; -222.15,-188.258 LED1.2@-221.996,-189.21 ; -222.15,-188.258 LED1.2@-221.82,-189.164 ; -222.15,-188.258 LED1.2@-221.996,-189.21
"PWM OFF": U2.4
R0: ?.1@-209.613,-198.813 pad.@-223.525,-192.242 U1.37 | length 217.9
  Top Layer w0.18: U1.37@-227.2,-187.923 -226.625,-187.923 ; ?.1@-209.613,-198.813 -209.613,-195.012 ; U1.37@-226.845,-187.923 -226.625,-187.923 ; U1.37@-226.845,-187.923 -226.625,-187.923 ; U1.37@-226.845,-187.923 -226.625,-187.923 ; -226.625,-187.923 -225.075,-189.473 -225.075,-190.692 pad.@-223.525,-192.242 ; -224.507,-191.26 pad.@-223.946,-192.53 ; -224.507,-191.26 pad.@-223.237,-191.821 ; -224.507,-191.26 pad.@-223.784,-192.446 ; -224.507,-191.26 pad.@-223.321,-191.982 ; -224.507,-191.26 pad.@-223.637,-192.342 ; -224.507,-191.26 pad.@-223.425,-192.13 ; -224.507,-191.26 pad.@-223.525,-192.242 ; -224.507,-191.26 pad.@-223.946,-192.53 ; -224.507,-191.26 pad.@-223.237,-191.821 ; -224.507,-191.26 pad.@-223.784,-192.446 ; -224.507,-191.26 pad.@-223.321,-191.982 ; -224.507,-191.26 pad.@-223.637,-192.342 ; -224.507,-191.26 pad.@-223.425,-192.13 ; -224.507,-191.26 pad.@-223.525,-192.242 ; -224.507,-191.26 pad.@-223.946,-192.53 ; -224.507,-191.26 pad.@-223.237,-191.821 ; -224.507,-191.26 pad.@-223.784,-192.446 ; -224.507,-191.26 pad.@-223.321,-191.982 ; -224.507,-191.26 pad.@-223.637,-192.342 ; -224.507,-191.26 pad.@-223.425,-192.13 ; -224.507,-191.26 pad.@-223.525,-192.242 ; -224.507,-191.26 pad.@-223.946,-192.53 ; -224.507,-191.26 pad.@-223.237,-191.821 ; -224.507,-191.26 pad.@-223.784,-192.446 ; -224.507,-191.26 pad.@-223.321,-191.982 ; -224.507,-191.26 pad.@-223.637,-192.342 ; -224.507,-191.26 pad.@-223.425,-192.13 ; -224.507,-191.26 pad.@-223.525,-192.242 ; -224.507,-191.26 pad.@-223.946,-192.53 ; -224.507,-191.26 pad.@-223.237,-191.821 ; -224.507,-191.26 pad.@-223.784,-192.446 ; -224.507,-191.26 pad.@-223.321,-191.982 ; -224.507,-191.26 pad.@-223.637,-192.342 ; -224.507,-191.26 pad.@-223.425,-192.13 ; -224.507,-191.26 pad.@-223.525,-192.242 ; -224.507,-191.26 pad.@-223.946,-192.53 ; -224.507,-191.26 pad.@-223.237,-191.821 ; -224.507,-191.26 pad.@-223.784,-192.446 ; -224.507,-191.26 pad.@-223.321,-191.982 ; -224.507,-191.26 pad.@-223.637,-192.342 ; -224.507,-191.26 pad.@-223.425,-192.13 ; -224.507,-191.26 pad.@-223.525,-192.242 ; -224.507,-191.26 pad.@-223.946,-192.53 ; -224.507,-191.26 pad.@-223.237,-191.821 ; -224.507,-191.26 pad.@-223.784,-192.446 ; -224.507,-191.26 pad.@-223.321,-191.982 ; -224.507,-191.26 pad.@-223.637,-192.342 ; -224.507,-191.26 pad.@-223.425,-192.13 ; -224.507,-191.26 pad.@-223.525,-192.242 ; -224.507,-191.26 pad.@-223.946,-192.53 ; -224.507,-191.26 pad.@-223.237,-191.821 ; -224.507,-191.26 pad.@-223.784,-192.446 ; -224.507,-191.26 pad.@-223.321,-191.982 ; -224.507,-191.26 pad.@-223.637,-192.342 ; -224.507,-191.26 pad.@-223.425,-192.13 ; -224.507,-191.26 pad.@-223.525,-192.242 ; -224.507,-191.26 pad.@-223.946,-192.53 ; -224.507,-191.26 pad.@-223.237,-191.821 ; -224.507,-191.26 pad.@-223.784,-192.446 ; -224.507,-191.26 pad.@-223.321,-191.982 ; -224.507,-191.26 pad.@-223.637,-192.342 ; -224.507,-191.26 pad.@-223.425,-192.13 ; -224.507,-191.26 pad.@-223.525,-192.242 ; pad.@-223.813,-192.662 -222.543,-193.223 ; pad.@-223.813,-192.662 -222.543,-193.223 ; pad.@-223.813,-192.662 -222.543,-193.223 ; pad.@-223.813,-192.662 -222.543,-193.223 ; pad.@-223.813,-192.662 -222.543,-193.223 ; pad.@-223.813,-192.662 -222.543,-193.223 ; pad.@-223.813,-192.662 -222.543,-193.223 ; pad.@-223.813,-192.662 -222.543,-193.223 ; pad.@-223.729,-192.501 -222.543,-193.223 ; pad.@-223.729,-192.501 -222.543,-193.223 ; pad.@-223.729,-192.501 -222.543,-193.223 ; pad.@-223.729,-192.501 -222.543,-193.223 ; pad.@-223.729,-192.501 -222.543,-193.223 ; pad.@-223.729,-192.501 -222.543,-193.223 ; pad.@-223.729,-192.501 -222.543,-193.223 ; pad.@-223.729,-192.501 -222.543,-193.223 ; pad.@-223.625,-192.353 -222.543,-193.223 ; pad.@-223.625,-192.353 -222.543,-193.223 ; pad.@-223.625,-192.353 -222.543,-193.223 ; pad.@-223.625,-192.353 -222.543,-193.223 ; pad.@-223.625,-192.353 -222.543,-193.223 ; pad.@-223.625,-192.353 -222.543,-193.223 ; pad.@-223.625,-192.353 -222.543,-193.223 ; pad.@-223.625,-192.353 -222.543,-193.223 ; pad.@-223.525,-192.242 -222.444,-193.323 -214.459,-193.323 -213.419,-194.363 -210.263,-194.363 -209.613,-195.012 ; pad.@-223.525,-192.242 -222.543,-193.223 ; pad.@-223.525,-192.242 -222.543,-193.223 ; pad.@-223.525,-192.242 -222.543,-193.223 ; pad.@-223.525,-192.242 -222.543,-193.223 ; pad.@-223.525,-192.242 -222.543,-193.223 ; pad.@-223.525,-192.242 -222.543,-193.223 ; pad.@-223.413,-192.141 -222.543,-193.223 ; pad.@-223.413,-192.141 -222.543,-193.223 ; pad.@-223.413,-192.141 -222.543,-193.223 ; pad.@-223.413,-192.141 -222.543,-193.223 ; pad.@-223.413,-192.141 -222.543,-193.223 ; pad.@-223.413,-192.141 -222.543,-193.223 ; pad.@-223.413,-192.141 -222.543,-193.223 ; pad.@-223.413,-192.141 -222.543,-193.223 ; pad.@-223.266,-192.038 -222.543,-193.223 ; pad.@-223.266,-192.038 -222.543,-193.223 ; pad.@-223.266,-192.038 -222.543,-193.223 ; pad.@-223.266,-192.038 -222.543,-193.223 ; pad.@-223.266,-192.038 -222.543,-193.223 ; pad.@-223.266,-192.038 -222.543,-193.223 ; pad.@-223.266,-192.038 -222.543,-193.223 ; pad.@-223.266,-192.038 -222.543,-193.223 ; pad.@-223.104,-191.953 -222.543,-193.223 ; pad.@-223.104,-191.953 -222.543,-193.223 ; pad.@-223.104,-191.953 -222.543,-193.223 ; pad.@-223.104,-191.953 -222.543,-193.223 ; pad.@-223.104,-191.953 -222.543,-193.223 ; pad.@-223.104,-191.953 -222.543,-193.223 ; pad.@-223.104,-191.953 -222.543,-193.223 ; pad.@-223.104,-191.953 -222.543,-193.223 ; ?.1@-209.917,-195.807 -209.613,-195.012 ; ?.1@-209.917,-195.807 -209.613,-195.012 ; ?.1@-209.917,-195.807 -209.613,-195.012 ; ?.1@-209.917,-195.807 -209.613,-195.012 ; ?.1@-209.917,-195.807 -209.613,-195.012 ; ?.1@-209.917,-195.807 -209.613,-195.012 ; ?.1@-209.917,-195.807 -209.613,-195.012 ; ?.1@-209.742,-195.853 -209.613,-195.012 ; ?.1@-209.742,-195.853 -209.613,-195.012 ; ?.1@-209.742,-195.853 -209.613,-195.012 ; ?.1@-209.742,-195.853 -209.613,-195.012 ; ?.1@-209.742,-195.853 -209.613,-195.012 ; ?.1@-209.742,-195.853 -209.613,-195.012 ; ?.1@-209.742,-195.853 -209.613,-195.012 ; ?.1@-209.613,-195.863 -209.613,-195.012 ; ?.1@-209.613,-195.863 -209.613,-195.012 ; ?.1@-209.613,-195.863 -209.613,-195.012 ; ?.1@-209.613,-195.863 -209.613,-195.012 ; ?.1@-209.613,-195.863 -209.613,-195.012 ; ?.1@-209.613,-195.863 -209.613,-195.012 ; ?.1@-209.613,-195.863 -209.613,-195.012 ; -209.613,-195.012 ?.1@-209.308,-195.807 ; -209.613,-195.012 ?.1@-209.483,-195.853 ; -209.613,-195.012 ?.1@-209.308,-195.807 ; -209.613,-195.012 ?.1@-209.483,-195.853 ; -209.613,-195.012 ?.1@-209.308,-195.807 ; -209.613,-195.012 ?.1@-209.483,-195.853 ; -209.613,-195.012 ?.1@-209.308,-195.807 ; -209.613,-195.012 ?.1@-209.483,-195.853 ; -209.613,-195.012 ?.1@-209.308,-195.807 ; -209.613,-195.012 ?.1@-209.483,-195.853 ; -209.613,-195.012 ?.1@-209.308,-195.807 ; -209.613,-195.012 ?.1@-209.483,-195.853 ; -209.613,-195.012 ?.1@-209.308,-195.807 ; -209.613,-195.012 ?.1@-209.483,-195.853
R1: ?.1@-207.812,-198.794 U1.38 | length 54.6
  Top Layer w0.18: U1.38@-227.2,-187.522 -226.516,-187.522 ; ?.1@-207.812,-198.794 -207.812,-195.061 ; U1.38@-226.845,-187.522 -226.516,-187.522 ; U1.38@-226.845,-187.522 -226.516,-187.522 ; U1.38@-226.845,-187.522 -226.516,-187.522 ; -226.516,-187.522 -221.076,-192.963 -214.31,-192.963 -213.27,-194.003 -210.113,-194.003 -209.451,-194.665 -208.207,-194.665 -207.812,-195.061 ; ?.1@-208.116,-195.782 -207.812,-195.061 ; ?.1@-208.116,-195.782 -207.812,-195.061 ; ?.1@-208.116,-195.782 -207.812,-195.061 ; ?.1@-208.116,-195.782 -207.812,-195.061 ; ?.1@-208.116,-195.782 -207.812,-195.061 ; ?.1@-208.116,-195.782 -207.812,-195.061 ; ?.1@-208.116,-195.782 -207.812,-195.061 ; ?.1@-207.941,-195.833 -207.812,-195.061 ; ?.1@-207.941,-195.833 -207.812,-195.061 ; ?.1@-207.941,-195.833 -207.812,-195.061 ; ?.1@-207.941,-195.833 -207.812,-195.061 ; ?.1@-207.941,-195.833 -207.812,-195.061 ; ?.1@-207.941,-195.833 -207.812,-195.061 ; ?.1@-207.941,-195.833 -207.812,-195.061 ; ?.1@-207.812,-195.844 -207.812,-195.061 ; ?.1@-207.812,-195.844 -207.812,-195.061 ; ?.1@-207.812,-195.844 -207.812,-195.061 ; ?.1@-207.812,-195.844 -207.812,-195.061 ; ?.1@-207.812,-195.844 -207.812,-195.061 ; ?.1@-207.812,-195.844 -207.812,-195.061 ; ?.1@-207.812,-195.844 -207.812,-195.061 ; -207.812,-195.061 ?.1@-207.508,-195.782 ; -207.812,-195.061 ?.1@-207.682,-195.833 ; -207.812,-195.061 ?.1@-207.508,-195.782 ; -207.812,-195.061 ?.1@-207.682,-195.833 ; -207.812,-195.061 ?.1@-207.508,-195.782 ; -207.812,-195.061 ?.1@-207.682,-195.833 ; -207.812,-195.061 ?.1@-207.508,-195.782 ; -207.812,-195.061 ?.1@-207.682,-195.833 ; -207.812,-195.061 ?.1@-207.508,-195.782 ; -207.812,-195.061 ?.1@-207.682,-195.833 ; -207.812,-195.061 ?.1@-207.508,-195.782 ; -207.812,-195.061 ?.1@-207.682,-195.833 ; -207.812,-195.061 ?.1@-207.508,-195.782 ; -207.812,-195.061 ?.1@-207.682,-195.833
R2: ?.1@-206.02,-198.794 pad.@-220.575,-191.748 U1.39 | length 188.7
  Top Layer w0.18: U1.39@-227.2,-187.123 -226.407,-187.123 ; -213.116,-193.631 -214.854,-191.893 -220.436,-191.893 -220.578,-191.751 -221.778,-191.751 -226.407,-187.123 ; U1.39@-226.845,-187.123 -226.407,-187.123 ; U1.39@-226.845,-187.123 -226.407,-187.123 ; U1.39@-226.845,-187.123 -226.407,-187.123 ; -221.715,-191.751 pad.@-220.688,-192.245 ; -221.715,-191.751 pad.@-220.691,-191.251 ; -221.715,-191.751 pad.@-220.622,-192.074 ; -221.715,-191.751 pad.@-220.624,-191.421 ; -221.715,-191.751 pad.@-220.584,-191.897 ; -221.715,-191.751 pad.@-220.585,-191.598 ; -221.715,-191.751 pad.@-220.575,-191.748 ; -221.715,-191.751 pad.@-220.688,-192.245 ; -221.715,-191.751 pad.@-220.691,-191.251 ; -221.715,-191.751 pad.@-220.622,-192.074 ; -221.715,-191.751 pad.@-220.624,-191.421 ; -221.715,-191.751 pad.@-220.584,-191.897 ; -221.715,-191.751 pad.@-220.585,-191.598 ; -221.715,-191.751 pad.@-220.575,-191.748 ; -221.715,-191.751 pad.@-220.688,-192.245 ; -221.715,-191.751 pad.@-220.691,-191.251 ; -221.715,-191.751 pad.@-220.622,-192.074 ; -221.715,-191.751 pad.@-220.624,-191.421 ; -221.715,-191.751 pad.@-220.584,-191.897 ; -221.715,-191.751 pad.@-220.585,-191.598 ; -221.715,-191.751 pad.@-220.575,-191.748 ; -221.715,-191.751 pad.@-220.688,-192.245 ; -221.715,-191.751 pad.@-220.691,-191.251 ; -221.715,-191.751 pad.@-220.622,-192.074 ; -221.715,-191.751 pad.@-220.624,-191.421 ; -221.715,-191.751 pad.@-220.584,-191.897 ; -221.715,-191.751 pad.@-220.585,-191.598 ; -221.715,-191.751 pad.@-220.575,-191.748 ; -221.715,-191.751 pad.@-220.688,-192.245 ; -221.715,-191.751 pad.@-220.691,-191.251 ; -221.715,-191.751 pad.@-220.622,-192.074 ; -221.715,-191.751 pad.@-220.624,-191.421 ; -221.715,-191.751 pad.@-220.584,-191.897 ; -221.715,-191.751 pad.@-220.585,-191.598 ; -221.715,-191.751 pad.@-220.575,-191.748 ; -221.715,-191.751 pad.@-220.688,-192.245 ; -221.715,-191.751 pad.@-220.691,-191.251 ; -221.715,-191.751 pad.@-220.622,-192.074 ; -221.715,-191.751 pad.@-220.624,-191.421 ; -221.715,-191.751 pad.@-220.584,-191.897 ; -221.715,-191.751 pad.@-220.585,-191.598 ; -221.715,-191.751 pad.@-220.575,-191.748 ; -221.715,-191.751 pad.@-220.688,-192.245 ; -221.715,-191.751 pad.@-220.691,-191.251 ; -221.715,-191.751 pad.@-220.622,-192.074 ; -221.715,-191.751 pad.@-220.624,-191.421 ; -221.715,-191.751 pad.@-220.584,-191.897 ; -221.715,-191.751 pad.@-220.585,-191.598 ; -221.715,-191.751 pad.@-220.575,-191.748 ; -221.715,-191.751 pad.@-220.688,-192.245 ; -221.715,-191.751 pad.@-220.691,-191.251 ; -221.715,-191.751 pad.@-220.622,-192.074 ; -221.715,-191.751 pad.@-220.624,-191.421 ; -221.715,-191.751 pad.@-220.584,-191.897 ; -221.715,-191.751 pad.@-220.585,-191.598 ; -221.715,-191.751 pad.@-220.575,-191.748 ; -221.715,-191.751 pad.@-220.688,-192.245 ; -221.715,-191.751 pad.@-220.691,-191.251 ; -221.715,-191.751 pad.@-220.622,-192.074 ; -221.715,-191.751 pad.@-220.624,-191.421 ; -221.715,-191.751 pad.@-220.584,-191.897 ; -221.715,-191.751 pad.@-220.585,-191.598 ; -221.715,-191.751 pad.@-220.575,-191.748 ; pad.@-220.584,-191.897 -219.431,-191.893 ; pad.@-220.584,-191.897 -219.417,-191.893 ; pad.@-220.584,-191.897 -219.417,-191.893 ; pad.@-220.584,-191.897 -219.417,-191.893 ; pad.@-220.584,-191.897 -219.43,-191.89 ; pad.@-220.584,-191.897 -219.439,-191.89 ; pad.@-220.584,-191.897 -219.417,-191.893 ; pad.@-220.584,-191.897 -219.417,-191.893 ; pad.@-220.584,-191.897 -219.417,-191.893 ; pad.@-220.575,-191.748 -219.417,-191.893 ; pad.@-220.575,-191.748 -219.417,-191.893 ; pad.@-220.575,-191.748 -219.417,-191.893 ; pad.@-220.575,-191.748 -219.43,-191.89 ; pad.@-220.575,-191.748 -219.431,-191.893 ; pad.@-220.575,-191.748 -219.417,-191.893 ; pad.@-220.575,-191.748 -219.417,-191.893 ; pad.@-220.575,-191.748 -219.417,-191.893 ; pad.@-220.569,-192.078 -219.417,-191.893 ; pad.@-220.569,-192.078 -219.417,-191.893 ; pad.@-220.569,-192.078 -219.417,-191.893 ; pad.@-220.569,-192.078 -219.431,-191.893 ; pad.@-220.569,-192.078 -219.417,-191.893 ; pad.@-220.569,-192.078 -219.417,-191.893 ; pad.@-220.569,-192.078 -219.417,-191.893 ; pad.@-220.547,-191.6 -219.417,-191.893 ; pad.@-220.547,-191.6 -219.417,-191.893 ; pad.@-220.547,-191.6 -219.417,-191.893 ; pad.@-220.547,-191.6 -219.43,-191.89 ; pad.@-220.547,-191.6 -219.417,-191.893 ; pad.@-220.547,-191.6 -219.417,-191.893 ; pad.@-220.547,-191.6 -219.417,-191.893 ; pad.@-220.526,-192.255 -219.417,-191.893 ; pad.@-220.526,-192.255 -219.417,-191.893 ; pad.@-220.526,-192.255 -219.417,-191.893 ; pad.@-220.526,-192.255 -219.431,-191.893 ; pad.@-220.526,-192.255 -219.417,-191.893 ; pad.@-220.526,-192.255 -219.417,-191.893 ; pad.@-220.526,-192.255 -219.417,-191.893 ; pad.@-220.488,-191.429 -219.417,-191.893 ; pad.@-220.488,-191.429 -219.417,-191.893 ; pad.@-220.488,-191.429 -219.417,-191.893 ; pad.@-220.488,-191.429 -219.43,-191.89 ; pad.@-220.488,-191.429 -219.417,-191.893 ; pad.@-220.488,-191.429 -219.417,-191.893 ; pad.@-220.488,-191.429 -219.417,-191.893 ; pad.@-220.403,-191.268 -219.417,-191.893 ; pad.@-220.403,-191.268 -219.417,-191.893 ; pad.@-220.403,-191.268 -219.417,-191.893 ; pad.@-220.402,-191.268 -219.43,-191.89 ; pad.@-220.403,-191.268 -219.417,-191.893 ; pad.@-220.403,-191.268 -219.417,-191.893 ; pad.@-220.403,-191.268 -219.417,-191.893 ; -219.439,-191.89 -220.4,-191.268 -219.431,-191.893 ; -219.439,-191.89 -220.524,-192.255 -219.43,-191.89 ; -219.439,-191.89 -220.487,-191.43 -219.431,-191.893 ; -219.439,-191.89 -220.569,-192.078 -219.43,-191.89 ; -219.439,-191.89 -220.547,-191.6 -219.431,-191.893
  Top Layer w0.203: -213.116,-193.631 -209.959,-193.631 -209.297,-194.294 -206.482,-194.294 -206.02,-194.756 ?.1@-206.02,-198.794 ; ?.1@-206.315,-195.8 -206.02,-194.834 ; ?.1@-206.315,-195.8 -206.02,-194.834 ; ?.1@-206.315,-195.8 -206.02,-194.834 ; ?.1@-206.315,-195.8 -206.02,-194.834 ; ?.1@-206.315,-195.8 -206.02,-194.834 ; ?.1@-206.02,-195.844 -206.02,-194.834 ; ?.1@-206.02,-195.844 -206.02,-194.834 ; ?.1@-206.02,-195.844 -206.02,-194.834 ; ?.1@-206.02,-195.844 -206.02,-194.834 ; ?.1@-206.02,-195.844 -206.02,-194.834 ; -206.02,-194.834 ?.1@-205.725,-195.8 ; -206.02,-194.834 ?.1@-205.725,-195.8 ; -206.02,-194.834 ?.1@-205.725,-195.8 ; -206.02,-194.834 ?.1@-205.725,-195.8 ; -206.02,-194.834 ?.1@-205.725,-195.8
R3: ?.1@-204.234,-198.813 U1.40 | length 65
  Top Layer w0.18: U1.40@-227.2,-186.723 -226.298,-186.723 ; ?.1@-204.234,-198.813 -204.234,-194.563 -204.876,-193.922 -209.143,-193.922 -209.806,-193.259 -212.962,-193.259 -214.002,-192.22 -214.018,-192.22 -214.705,-191.533 -218.865,-191.533 -219.81,-190.588 -222.433,-190.588 -226.298,-186.723 ; U1.40@-226.845,-186.723 -226.298,-186.723 ; U1.40@-226.845,-186.723 -226.298,-186.723 ; U1.40@-226.845,-186.723 -226.298,-186.723 ; ?.1@-204.54,-195.812 -204.234,-194.923 ; ?.1@-204.54,-195.812 -204.234,-194.923 ; ?.1@-204.54,-195.812 -204.234,-194.923 ; ?.1@-204.54,-195.812 -204.234,-194.923 ; ?.1@-204.54,-195.812 -204.234,-194.923 ; ?.1@-204.54,-195.812 -204.234,-194.923 ; ?.1@-204.54,-195.812 -204.234,-194.923 ; ?.1@-204.364,-195.854 -204.234,-194.923 ; ?.1@-204.364,-195.854 -204.234,-194.923 ; ?.1@-204.364,-195.854 -204.234,-194.923 ; ?.1@-204.364,-195.854 -204.234,-194.923 ; ?.1@-204.364,-195.854 -204.234,-194.923 ; ?.1@-204.364,-195.854 -204.234,-194.923 ; ?.1@-204.364,-195.854 -204.234,-194.923 ; ?.1@-204.234,-195.863 -204.234,-194.923 ; ?.1@-204.234,-195.863 -204.234,-194.923 ; ?.1@-204.234,-195.863 -204.234,-194.923 ; ?.1@-204.234,-195.863 -204.234,-194.923 ; ?.1@-204.234,-195.863 -204.234,-194.923 ; ?.1@-204.234,-195.863 -204.234,-194.923 ; ?.1@-204.234,-195.863 -204.234,-194.923 ; -204.234,-194.923 ?.1@-203.929,-195.812 ; -204.234,-194.923 ?.1@-204.105,-195.854 ; -204.234,-194.923 ?.1@-203.929,-195.812 ; -204.234,-194.923 ?.1@-204.105,-195.854 ; -204.234,-194.923 ?.1@-203.929,-195.812 ; -204.234,-194.923 ?.1@-204.105,-195.854 ; -204.234,-194.923 ?.1@-203.929,-195.812 ; -204.234,-194.923 ?.1@-204.105,-195.854 ; -204.234,-194.923 ?.1@-203.929,-195.812 ; -204.234,-194.923 ?.1@-204.105,-195.854 ; -204.234,-194.923 ?.1@-203.929,-195.812 ; -204.234,-194.923 ?.1@-204.105,-195.854 ; -204.234,-194.923 ?.1@-203.929,-195.812 ; -204.234,-194.923 ?.1@-204.105,-195.854